# Altium PCB PWM_controller.PcbDoc
Units mm, origin at the board's own origin, x right, y up, seen from the top; angles counter-clockwise.
Board outline 60.25 x 55.25 mm, 2 copper layers (Top Layer, Bottom Layer); 94 components, 42 nets, 210 pads, 36 vias.
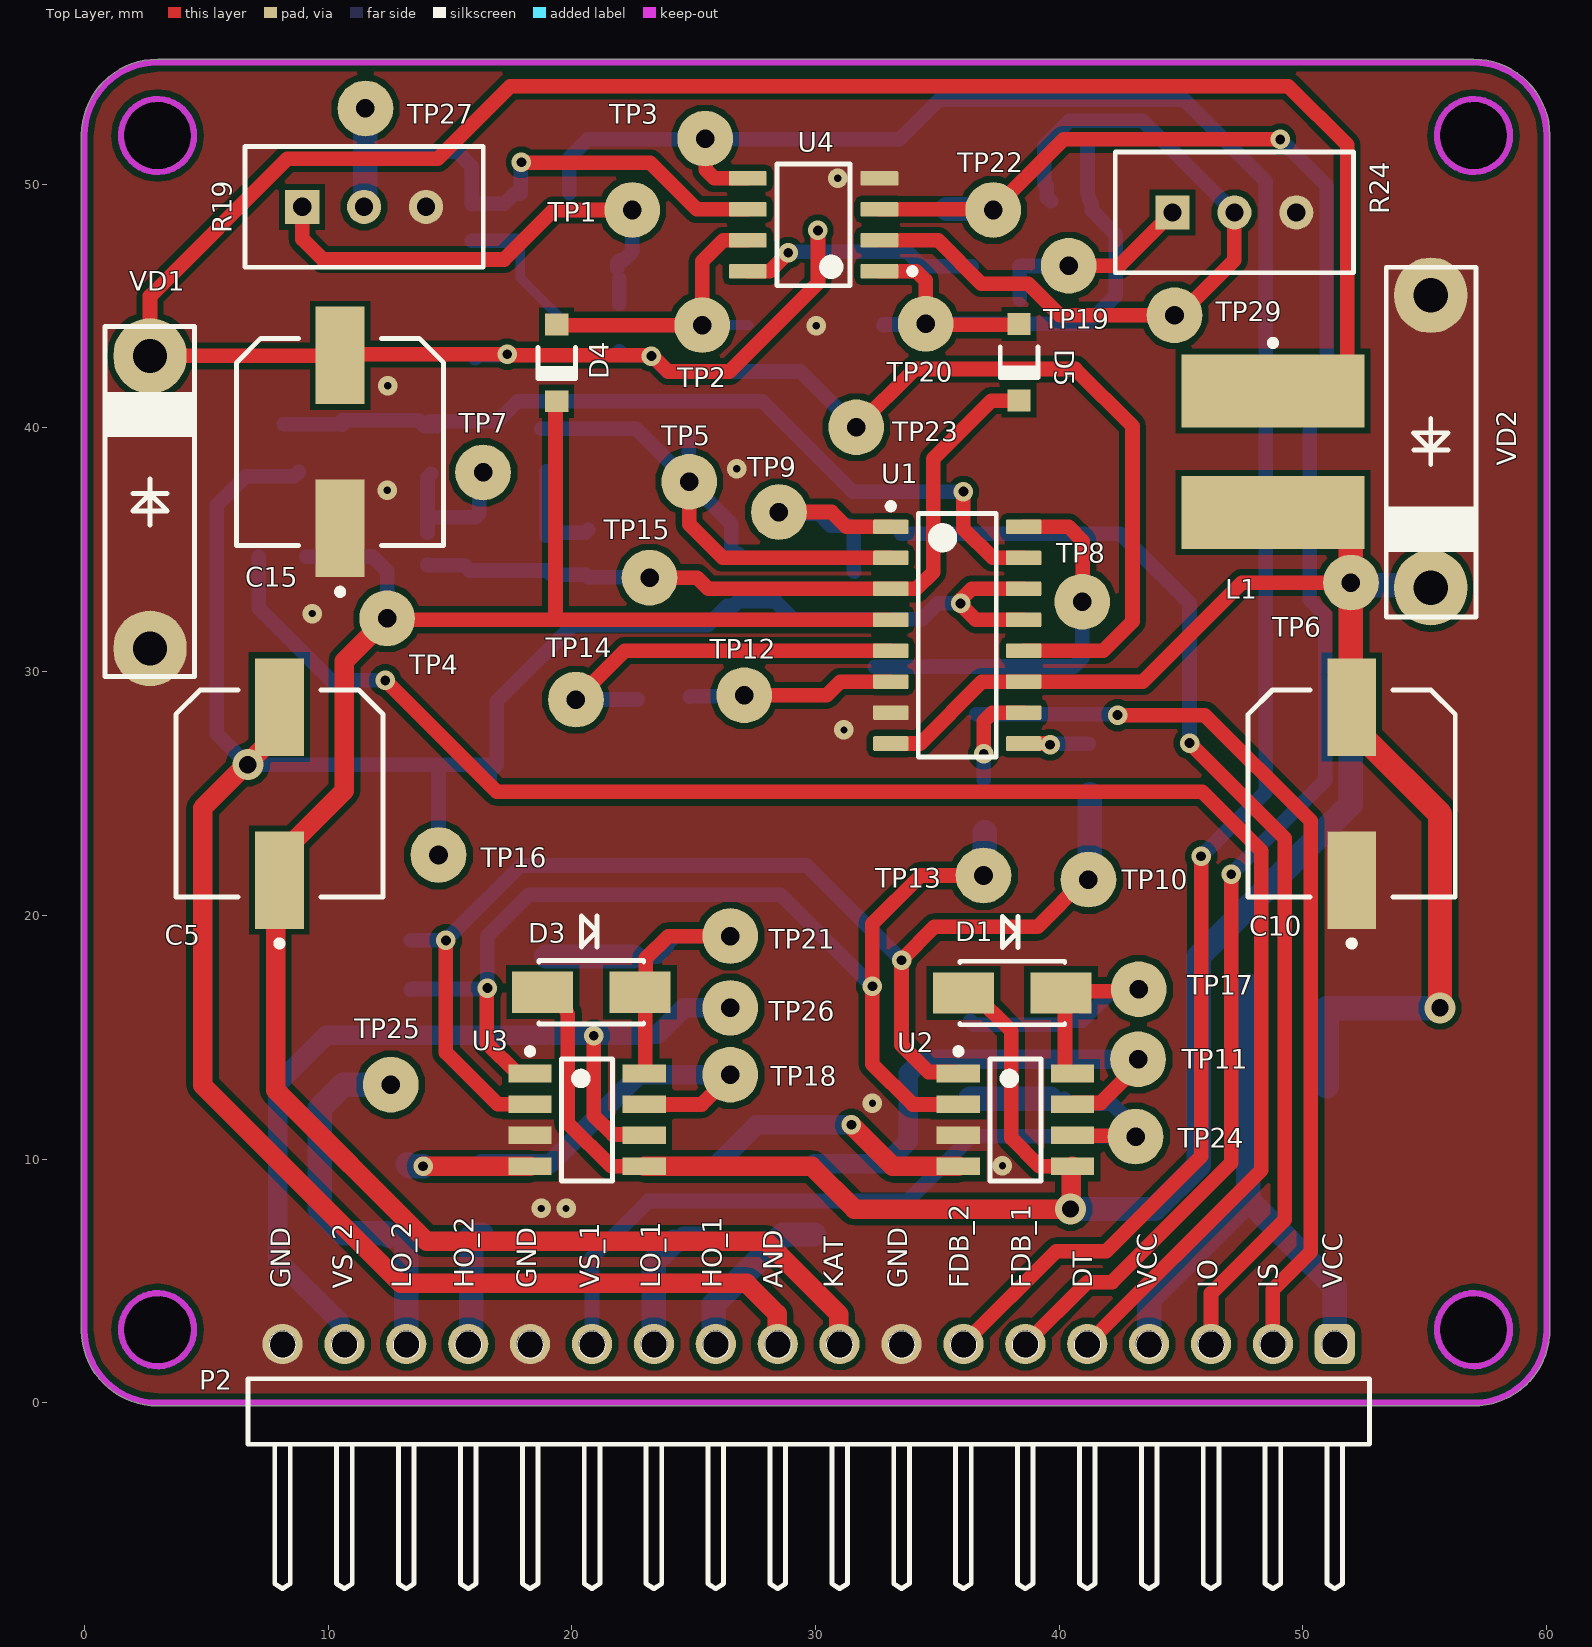
[diagram p0: Top Layer view]
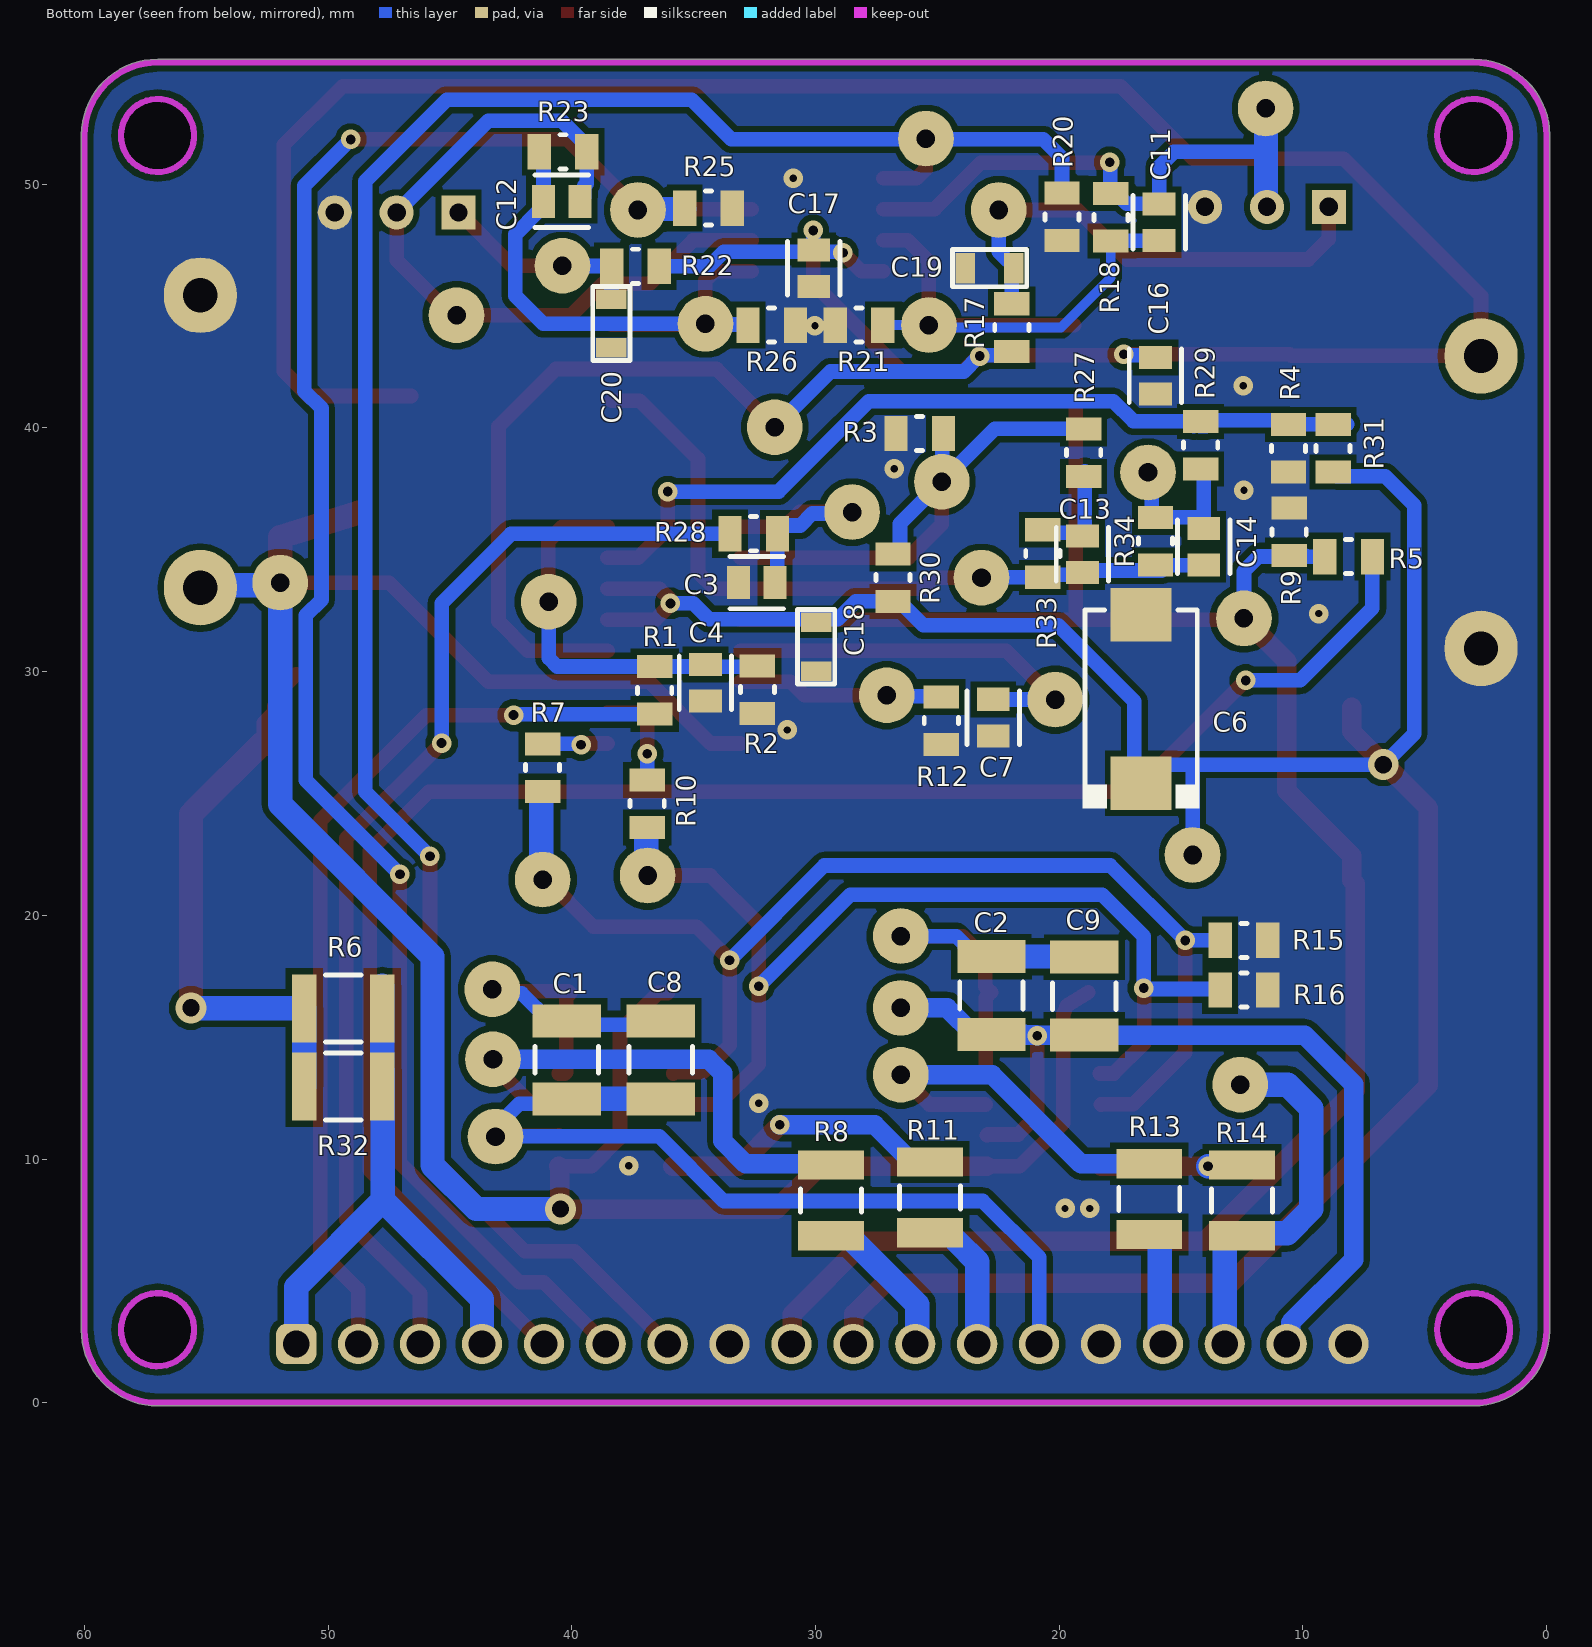
[diagram p1: Bottom Layer view, seen from below]
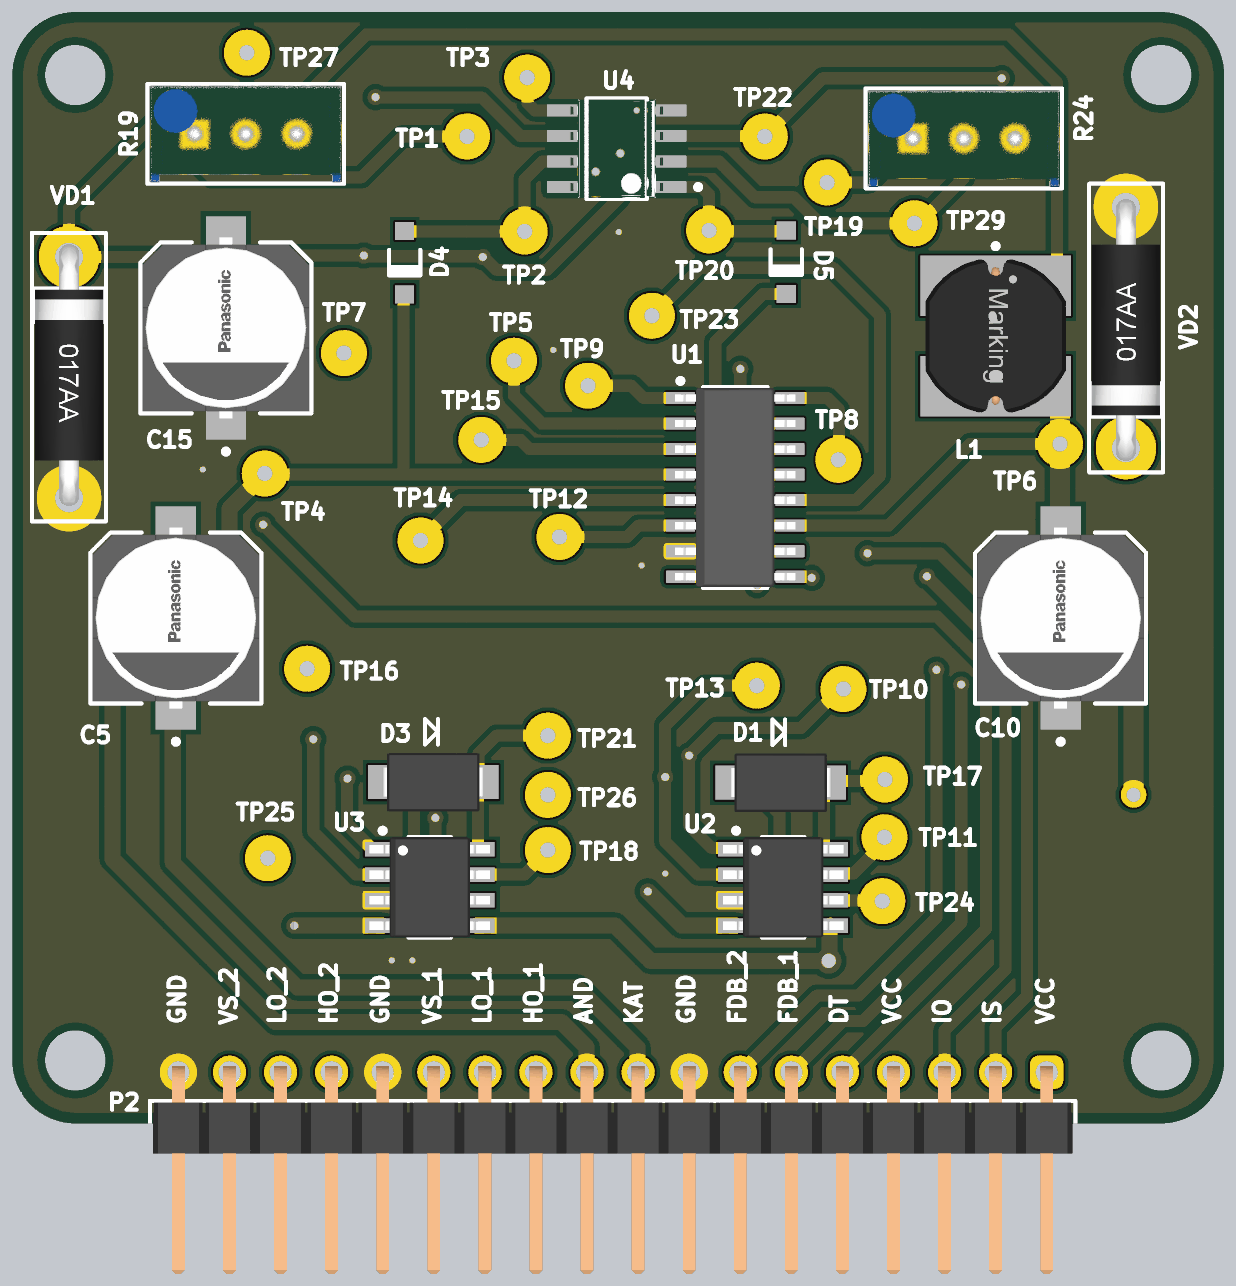
[diagram p2: 3D render of the assembled board from above, using the file's embedded part models]
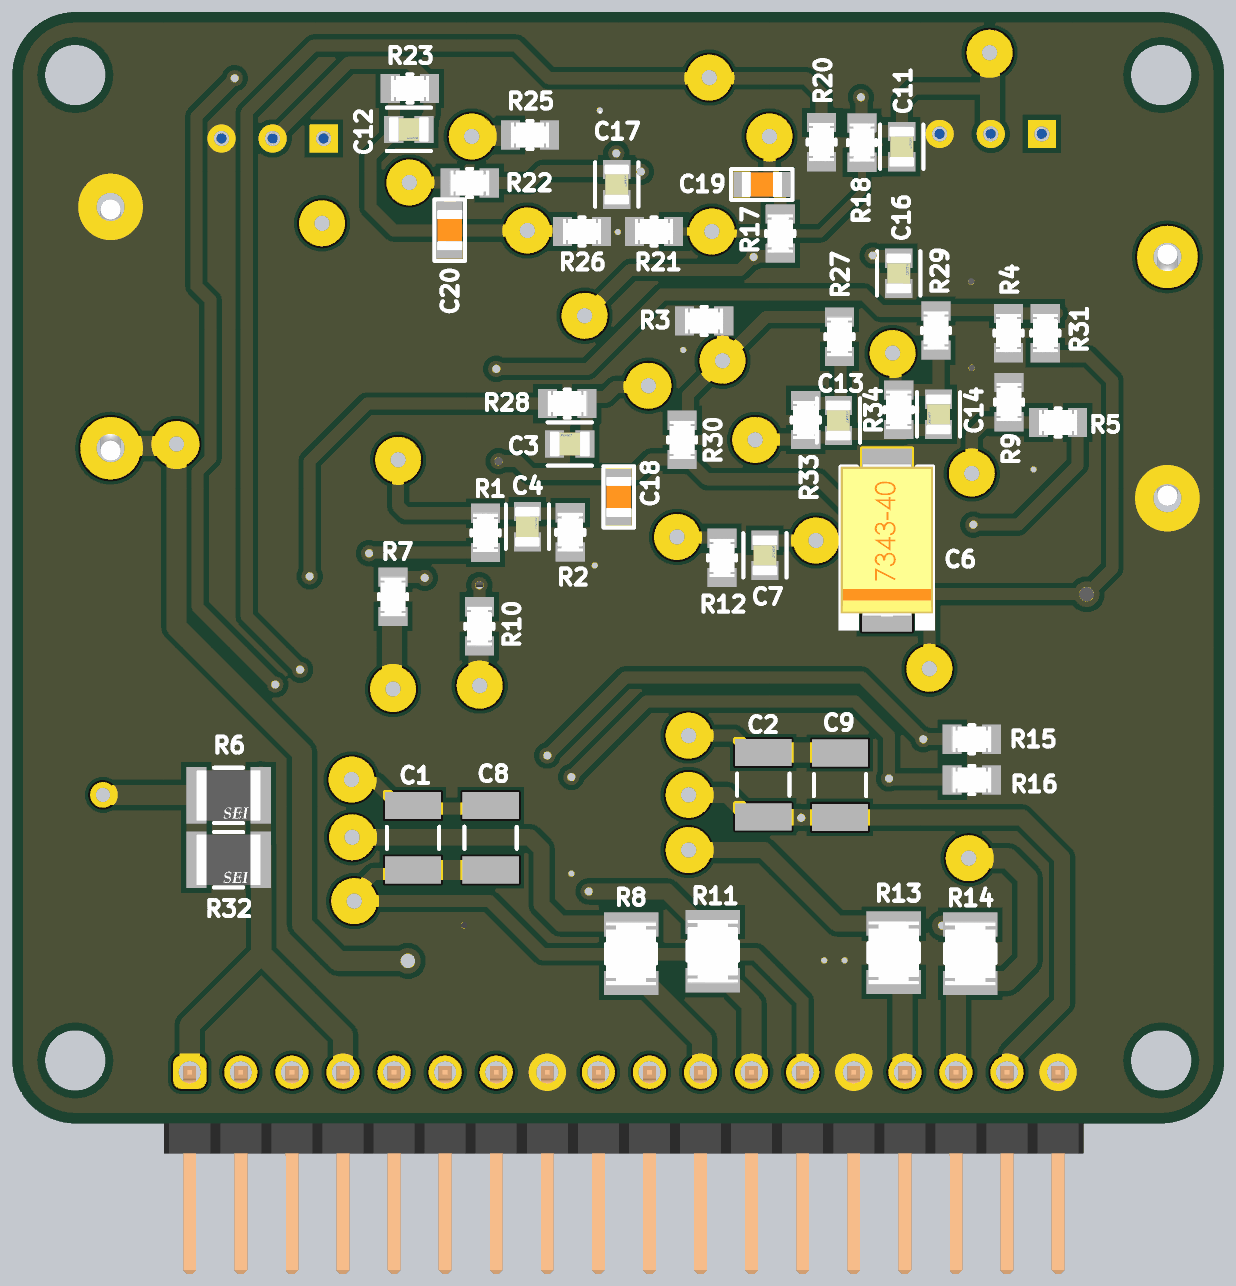
[diagram p3: 3D render of the assembled board from below, using the file's embedded part models]

## Layer stack, top to bottom
Top Solder: solder mask 0.0102, Solder Resist, Dk 3.5
Top Layer: signal copper 0.0356
Dielectric 1: dielectric 0.32, FR-4, Dk 4.8
Bottom Layer: signal copper 0.0356
Bottom Solder: solder mask 0.0102, Solder Resist, Dk 3.5

## Board outline
-0.127,2.972 -0.127,51.999 -0.127,52.024 cw(c3,52) 3,55.127 3.001,55.127 57,55.127 cw(c57,52) 60.127,52.024 60.127,51.999 60.127,3.073 60.127,3 cw(c57,3) 57,-0.127 56.972,-0.127 3.023,-0.127 3,-0.127 cw(c3,3)
cut-out: 1.5,52 ccw(c3,52) 3,50.5 ccw(c3,52) 4.5,52 ccw(c3,52) 3,53.5 ccw(c3,52)
cut-out: 1.5,3 ccw(c3,3) 3,1.5 ccw(c3,3) 4.5,3 ccw(c3,3) 3,4.5 ccw(c3,3)
cut-out: 55.5,3 ccw(c57,3) 57,1.5 ccw(c57,3) 58.5,3 ccw(c57,3) 57,4.5 ccw(c57,3)
cut-out: 55.5,52 ccw(c57,52) 57,50.5 ccw(c57,52) 58.5,52 ccw(c57,52) 57,53.5 ccw(c57,52)

## Design rules (kind name [scope] priority, off if disabled: settings)
Clearance [All] p1: gap=0.254 ignorepadtopadclearanceinfootprint=FALSE except(0: Arc-Hole Track-Hole SMDPad-Hole THPad-Hole Via-Hole Fill-Hole Poly-Hole Region-Hole Text-Hole)
Height [All] p1: minheight=0 maxheight=101.6 prefheight=12.7
PlaneConnect [All] p1: planeconnectstyle=Direct reliefexpansion=0.508 reliefentries=4 reliefconductorwidth=0.254 reliefairgap=0.254
PolygonConnect [All] p1: connectstyle=Direct reliefconductorwidth=0.254 reliefentries=4 polygonreliefangle="90 Angle" airgapwidth=0.254
RoutingVias [All] p1: holewidth=0.711 width=1.27 viastyle="Through Hole" minholewidth=0.2 minwidth=0.5 maxholewidth=0.711 maxwidth=1.27
SolderMaskExpansion [All] p1: expansion=0.102 istentingtop=FALSE
Width [All] p1: maxlimit=3 minlimit=0.254 preferedwidth=1 minimp=50.000000 maximp=50.000000 favimp=50.000000
28 further rules are at their usual default settings.

## Components (designator, comment, footprint, x,y, rotation, side; value= is the part's Value field where it differs from the comment)
C1 "CAP 220nF 50V 1210(3225)" CAPC1210(3225)100_M 40.208,14.072 r270 bottom value=220nF
C2 "CAP 220nF 50V 1210(3225)" CAPC1210(3225)100_M 22.784,16.713 r270 bottom value=220nF
C3 "100nF" FP-C0805C-DN-MFG 32.41,33.655 r180 bottom value="10,000 pF"
C4 "100nF" FP-C0805C-DN-MFG 34.519,29.54 r270 bottom value="10,000 pF"
C5 "EEE-FK1H101GP" FP-FKF-MFG 8,25 r90 top locked
C6 "CAP-POLAR" CAP-TAN-D 16.637,28.88 r90 bottom
C7 "C0805C102K5RACTU" FP-C0805C-DN-MFG 22.708,28.118 r270 bottom value="1,000 pF"
C8 "CAP 220nF 50V 1210(3225)" CAPC1210(3225)100_M 36.347,14.072 r270 bottom value=220nF
C9 "CAP 220nF 50V 1210(3225)" CAPC1210(3225)100_M 18.974,16.688 r270 bottom value=220nF
C10 "EEE-FK1H101GP" FP-FKF-MFG 52,25 r90 top locked
C11 "C0805C102K5RACTU" FP-C0805C-DN-MFG 15.9,48.438 r270 bottom value="1,000 pF"
C12 "C0805C102K5RACTU" FP-C0805C-DN-MFG 40.411,49.301 r0 bottom value="1,000 pF"
C13 "100nF" FP-C0805C-DN-MFG 19.05,34.823 r270 bottom value="10,000 pF"
C14 "100nF" FP-C0805C-DN-MFG 14.072,35.128 r90 bottom value="10,000 pF"
C15 "EEE-FK1H101GP" FP-FKF-MFG 10.49,39.427 r90 top locked
C16 "100nF" FP-C0805C-DN-MFG 16.053,42.139 r270 bottom value="10,000 pF"
C17 "100nF" FP-C0805C-DN-MFG 30.074,46.558 r270 bottom locked value="10,000 pF"
C18 "CAP-NON-POLAR" CAP-0805 29.972,31.023 r90 bottom
C19 "0.1uF" CAP-0805 22.86,46.558 r180 bottom
C20 "0.1uF" CAP-0805 38.379,44.288 r90 bottom
D1 "US1M-13-F" DIOD-SMA-2_A_V 38.075,16.815 r0 top locked
D3 "US1M-13-F" DIOD-SMA-2_A_V 20.803,16.84 r0 top
D4 "1N4148W-7-F" DIOD-SOD123-2_V 19.38,42.672 r270 top
D5 "1N4148W-7-F" DIOD-SOD123-2_V 38.354,42.697 r270 top
L1 "390µH, 0.38A" WE-PD2_7850 48.768,39.025 r270 top
P2 "61301811021" 61301811021 29.718,-0.357 r0 top
R1 "2K" FP-CRCW0805-e3-MFG 36.601,29.235 r90 bottom
R2 "1K" FP-CRCW0805-e3-MFG 32.385,29.261 r270 bottom
R3 "2K" FP-CRCW0805-e3-MFG 25.73,39.776 r0 bottom
R4 "2K" FP-CRCW0805-e3-MFG 10.592,39.167 r270 bottom
R5 "10K" FP-CRCW0805-e3-MFG 8.128,34.722 r0 bottom
R6 "RMCF1210JT51R0" FP-RMCF1210-MFG 49.378,16.18 r180 bottom
R7 "2K" FP-CRCW0805-e3-MFG 41.199,26.06 r90 bottom
R8 "10E" FP-CRCW1210-e3-IPC_B 29.362,8.306 r270 bottom
R9 "5K" FP-CRCW0805-e3-MFG 10.566,35.738 r90 bottom
R10 "2K" FP-CRCW0805-e3-MFG 36.906,24.587 r90 bottom
R11 "10E" FP-CRCW1210-e3-IPC_B 25.298,8.433 r270 bottom
R12 "15K" FP-CRCW0805-e3-MFG 24.841,27.991 r270 bottom
R13 "10E" FP-CRCW1210-e3-IPC_B 16.307,8.357 r270 bottom
R14 "10E" FP-CRCW1210-e3-IPC_B 12.497,8.306 r270 bottom
R15 "1K" FP-CRCW0805-e3-MFG 12.421,18.974 r180 bottom
R16 "1K" FP-CRCW0805-e3-MFG 12.421,16.942 r180 bottom
R17 "10K" FP-CRCW0805-e3-MFG 21.946,44.12 r90 bottom
R18 "1M" FP-CRCW0805-e3-MFG 17.882,48.641 r270 bottom
R19 "10K" RES_Adj_3296W_Bourns 11.476,49.073 r270 top locked
R20 "100K" FP-CRCW0805-e3-MFG 19.888,48.666 r270 bottom
R21 "100K" FP-CRCW0805-e3-MFG 28.219,44.221 r0 bottom
R22 "10K" FP-CRCW0805-e3-MFG 37.389,46.634 r0 bottom
R23 "1M" FP-CRCW0805-e3-MFG 40.361,51.333 r0 bottom
R24 "10K" RES_Adj_3296W_Bourns 47.188,48.844 r270 top locked
R25 "100K" FP-CRCW0805-e3-MFG 34.392,49.022 r180 bottom
R26 "100K" FP-CRCW0805-e3-MFG 31.801,44.221 r180 bottom
R27 "2K" FP-CRCW0805-e3-MFG 18.999,38.989 r270 bottom
R28 "2K" FP-CRCW0805-e3-MFG 32.537,35.662 r180 bottom
R29 "2K" FP-CRCW0805-e3-MFG 14.199,39.294 r270 bottom
R30 "2K" FP-CRCW0805-e3-MFG 26.822,33.858 r270 bottom
R31 "2K" FP-CRCW0805-e3-MFG 8.763,39.167 r270 bottom
R32 "RMCF1210JT51R0" FP-RMCF1210-MFG 49.378,12.979 r180 bottom
R33 "200K" FP-CRCW0805-e3-MFG 20.676,34.849 r270 bottom
R34 "200K" FP-CRCW0805-e3-MFG 16.053,35.357 r90 bottom
TP1 "Test_Point_PCB" Test_Point#1 22.479,48.946 r0 top
TP2 "Test_Point_PCB" Test_Point#1 25.348,44.221 r0 top
TP3 "Test_Point_PCB" Test_Point#1 25.47,51.873 r0 top
TP4 "Test_Point_PCB" Test_Point#1 12.421,32.188 r0 top
TP5 "Test_Point_PCB" Test_Point#1 24.816,37.795 r0 top
TP6 "Test_Point_PCB" Test_Point#1 51.968,33.655 r0 top
TP7 "Test_Point_PCB" Test_Point#1 16.358,38.176 r0 top
TP8 "Test_Point_PCB" Test_Point#1 40.945,32.868 r0 top
TP9 "Test_Point_PCB" Test_Point#1 28.499,36.551 r0 top
TP10 "Test_Point_PCB" Test_Point#2 41.199,21.234 r90 top
TP11 "Test_Point_PCB" Test_Point#3 43.5,14.097 r90 top
TP12 "Test_Point_PCB" Test_Point#1 27.076,29.032 r90 top
TP13 "Test_Point_PCB" Test_Point#4 36.892,21.734 r90 top
TP14 "Test_Point_PCB" Test_Point#1 20.168,28.854 r90 top
TP15 "Test_Point_PCB" Test_Point#1 23.19,33.858 r90 top
TP16 "Test_Point_PCB" Test_Point#1 14.529,22.479 r90 top
TP17 "Test_Point_PCB" Test_Point#5 43.5,16.967 r90 top
TP18 "Test_Point_PCB" Test_Point#6 26.645,13.462 r90 top
TP19 "Test_Point_PCB" Test_Point#1 40.386,46.66 r90 top
TP20 "Test_Point_PCB" Test_Point#1 34.519,44.272 r90 top
TP21 "Test_Point_PCB" Test_Point#7 26.619,19.152 r90 top
TP22 "Test_Point_PCB" Test_Point#1 37.287,48.946 r90 top
TP23 "Test_Point_PCB" Test_Point#1 31.674,40.03 r90 top
TP24 "Test_Point_PCB" Test_Point#8 43.18,10.922 r90 top
TP25 "Test_Point_PCB" Test_Point#9 12.573,13.126 r90 top
TP26 "Test_Point_PCB" Test_Point#10 26.594,16.205 r90 top
TP27 "Test_Point_PCB" Test_Point#1 11.532,53.111 r90 top
TP29 "Test_Point_PCB" Test_Point#1 44.729,44.628 r90 top
U1 "TL494CDR" D0016A_N 35.814,31.496 r0 top
U2 "IR2181STRPBF" INTR-SOIC-8_V 38.202,11.608 r0 top
U3 "IR2181STRPBF" INTR-SOIC-8_V 20.625,11.608 r0 top locked
U4 "LM358DR" FP-D0008A-MFG 29.921,48.336 r180 top locked
VD1 "18V" DO-017AA 2.692,36.957 r270 top
VD2 "18V" DO-017AA 55.245,39.446 r90 top

## Footprints (in the part's own frame and the unit in brackets; to place one, negate y for a bottom-side part, rotate by r counter-clockwise, add the part's x,y. Pads: shape width x height; smd on the part's side, far side on the other; paste and mask are expansions set on the pad)
61301811021 [mm] "Pin Header, pitch 2.54 mm, THT, Angled, single row, 18p"
  rrect50% 1.65x1.65 hole 1.1: 1(21.59,2.77)
  round 1.65 hole 1.1: 2(19.05,2.77) 3(16.51,2.77) 4(13.97,2.77) 5(11.43,2.77) 6(8.89,2.77) 7(6.35,2.77) 8(3.81,2.77) 9(1.27,2.77) 10(-1.27,2.77) 11(-3.81,2.77) 12(-6.35,2.77) 13(-8.89,2.77) 14(-11.43,2.77) 15(-13.97,2.77) 16(-16.51,2.77) 17(-19.05,2.77) 18(-21.59,2.77)
  silkscreen extent -23.01,-7.27 23.01,1.35, body extent -22.86,-7.27 22.86,3.09, height 2.58
CAP-0805 [mm]
  rect 0.8x1.25 smd mask+0.015: 1(-1,0) 2(1,0)
  silkscreen extent -1.52,-0.76 1.52,0.76, body extent -1,-0.62 1,0.63, height 0.8
CAP-TAN-D [mm]
  rect 2.2x2.5 smd: 1(-3.45,0) 2(3.45,0)
  silkscreen extent -4.5,-2.4 3.65,2.4, body extent -3.8,-2.3 3.8,2.3, height 4
CAPC1210(3225)100_M [mm] "Chip Capacitor, Body 3.2x2.5mm, Height 1mm, IPC Low Density"
  rect 1.35x2.8 smd: 1(-1.6,0) 2(1.6,0)
  silkscreen extent -0.55,-1.3 0.55,1.3, body extent -1.7,-1.35 1.7,1.35, height 1
D0016A_N [mm] "SOIC, 16-Leads, Body 10x4mm, Pitch 1.27mm, IPC Medium Density"
  rrect17% 1.45x0.6 smd: 1(-2.725,4.445) 2(-2.725,3.175) 3(-2.725,1.905) 4(-2.725,0.635) 5(-2.725,-0.635) 6(-2.725,-1.905) 7(-2.725,-3.175) 8(-2.725,-4.445) 9(2.725,-4.445) 10(2.725,-3.175) 11(2.725,-1.905) 12(2.725,-0.635) 13(2.725,0.635) 14(2.725,1.905) 15(2.725,3.175) 16(2.725,4.445)
  silkscreen extent -2.85,-5 1.6,5.42, body extent -3,-4.95 3,4.95, height 1.59
DIOD-SMA-2_A_V [mm] "SMA, 2-Leads, Body 4.3x2.605mm"
  rect 2.5x1.7 smd: 1(-2,0) 2(2,0)
  silkscreen extent -2.15,-1.3 2.15,3.14, body extent -2.52,-1.46 2.52,1.46, height 2.4
DIOD-SOD123-2_V [mm] "SOD123, 2-Leads, Body 2.7x1.55mm, Height 1.45mm"
  rect 0.9x0.95 smd: 1(-1.575,0) 2(1.575,0)
  silkscreen extent -0.64,-0.83 0.64,0.77, body extent -1.35,-0.77 1.35,0.77, height 1.45
DO-017AA [mm]
  oval 3.1x3 hole 1.4: 1(-6,0) 2(6,0)
  silkscreen extent -7.2,-1.85 7.15,1.83, body extent -6.63,-1.7 6.37,1.7, height 3.4
FP-C0805C-DN-MFG [mm]
  rect 0.95x1.35 smd paste+0 mask+0: 1(-0.75,0) 2(0.75,0)
  silkscreen extent -1.1,-1.07 1.1,1.07, body extent -1,-0.63 1,0.63, height 0.88
FP-CRCW0805-e3-MFG [mm]
  rect 0.95x1.45 smd paste+0 mask+0: 1(-0.975,0) 2(0.975,0)
  silkscreen extent -0.13,-0.7 0.13,0.7, body extent -1,-0.63 1,0.63, height 0.5
FP-CRCW1210-e3-IPC_B [mm]
  rect 1.205x2.706 smd paste+0 mask+0: 1(-1.451,0) 2(1.451,0)
  silkscreen extent -0.47,-1.25 0.47,1.25, body extent -1.6,-1.25 1.6,1.25, height 0.6
FP-D0008A-MFG [mm]
  rrect17% 1.55x0.6 smd paste+0 mask+0: 1(-2.7,1.905) 2(-2.7,0.635) 3(-2.7,-0.635) 4(-2.7,-1.905) 5(2.7,-1.905) 6(2.7,-0.635) 7(2.7,0.635) 8(2.7,1.905)
  silkscreen extent -4.18,-2.5 1.5,2.5, body extent -3.57,-2.75 3.57,2.75, height 0.25
FP-FKF-MFG [mm]
  rect 4x2 smd paste+0 mask+0: 1(-3.55,0) 2(3.55,0)
  silkscreen extent -6.27,-4.25 4.25,4.25, body extent -5.8,-4.5 5.8,4.5, height 0.25
FP-RMCF1210-MFG [mm]
  rect 1x2.8 smd paste+0 mask+0: 1(-1.6,0) 2(1.6,0)
  silkscreen extent -0.72,-1.38 0.72,1.38, body extent -1.6,-1.25 1.6,1.25, height 0.7
INTR-SOIC-8_V [mm]
  rect 1.78x0.72 smd: 1(-2.34,1.905) 2(-2.34,0.635) 3(-2.34,-0.635) 4(-2.34,-1.905) 5(2.34,-1.905) 6(2.34,-0.635) 7(2.34,0.635) 8(2.34,1.905)
  silkscreen extent -2.46,-2.5 1.05,2.94, body extent -3,-2.5 3,2.5, height 1.75
RES_Adj_3296W_Bourns [mm]
  rect 1.4x1.4 hole 0.75 paste-2539.97 mask+0: 1(0,-2.54)
  round 1.4 hole 0.75 paste-2539.97 mask+0: 2(0,0) 3(0,2.54)
  silkscreen extent -2.49,-4.89 2.47,4.89, body extent -2.59,-4.99 2.57,4.99, height 0.25
Test_Point#1 [mil]
  round 90 hole 30 paste-99999 mask+4: 1(0,0)
Test_Point#2 [mil]
  round 90 hole 30 paste-99999 mask+4: 1(9.2,0)
Test_Point#3 [mil]
  round 90 hole 30 paste-99999 mask+4: 1(0,10.4)
Test_Point#4 [mil]
  round 90 hole 30 paste-99999 mask+4: 1(-3.8,0.08)
Test_Point#5 [mil]
  round 90 hole 30 paste-99999 mask+4: 1(0,9.4)
Test_Point#6 [mil]
  round 90 hole 30 paste-99999 mask+4: 1(0,5.69)
Test_Point#7 [mil]
  round 90 hole 30 paste-99999 mask+4: 1(0,4.69)
Test_Point#8 [mil]
  round 90 hole 30 paste-99999 mask+4: 1(0,1.93)
Test_Point#9 [mil]
  round 90 hole 30 paste-99999 mask+4: 1(-2.76,0)
Test_Point#10 [mil]
  round 90 hole 30 paste-99999 mask+4: 1(0,3.69)
WE-PD2_7850 [mm] "SMD Power Inductor, 2-Leads, body 7.8x7mm"
  rect 3x7.5 smd: 1(-2.5,0) 2(2.5,0)
  silkscreen extent -4.59,-0.12 -4.34,0.13, body extent -3.81,-3.5 3.81,3.5, height 4.95

## Part data
C1 C2 C8 C9: library part CMP-1038-01811-1, "CAP 220nF 50V ±10% 1210 (3225 Metric) Thickness 1mm SMD", Case-EIA=1210, Case-Metric=3225, Rated Voltage="50 V", Tolerance=Â±10%, Max Thickness="1 mm", Technology=SMT
C3 C4 C13 C14 C16 C17: library part CMP-2007-00254-2, "CAP CER 10000PF 50V X7R 0805", Capacitance="10,000 pF", Manufacturer=KEMET, Manufacturer Part Number=C0805C103J5RACTU, Package=C0805C-DN, Temperature="-55°C to +125°C", Temperature Characteristic=X7R, Temperature Coefficient=30ppm/°C, Temperature Range High=+125°C, Temperature Range Low=-55°C, Tolerance=0.05, Voltage Rating="50 V", Automotive=No, Category=Cap, ComponentLink2Description=Datasheet, ComponentLink2URL=https://content.kemet.com/datasheets/KEM_C1003_C0G_SMD.pdf, Device Class L1="Passive Components", Device Class L2=Capacitors, Device Class L3="Ceramic Capacitors", Digikey Description="CAP CER 10000PF 50V X7R 0805", Height=0.88mm, Ipc Land Pattern Name=CAPC200125X78, Lead Free=Yes, Material=Ceramic, Mouser Description="Capacitor; Ceramic; Cap 0.01uF; Tol 5%; Vol-Rtg 50 V; SMT; Case 0805; X7R; TR", Octopart=https://octopart.com/c0805c103j5ractu-kemet-133473, RoHS=TRUE
C5 C10 C15: library part CMP-05427-000032-1, "CAP ALUM 100UF 20% 50V SMD", Capacitance=100uF, Case/Package=SMD/SMT, ESR (Equivalent Series Resistance)=340mR, Leakage Current=10mA, Max Operating Temperature=105°C, Min Operating Temperature=-55°C, Package Quantity=1, Ripple Current=350mA, Tolerance=20%, Voltage=50V, Construction=Cylindrical, Contact Plating=Tin, Diameter=8mm, Height=10.2mm, Height - Seated (Max)=0.402inch, Impedance=340mR, Lead Free="Lead Free", Length=10.2mm, Life (Hours)=5000Hour, Mount="Surface Mount", Number of Pins=2, Packaging="Tape and Reel", Radiation Hardening=No, REACH SVHC="No SVHC", Ripple Current (AC)=350mA, RoHS Compliant=Yes, Series=FK, Termination=SMD/SMT, Voltage Rating=50V, Voltage Rating (DC)=50V, Width=10mm
C7 C11 C12: library part CMP-2007-01097-2, "CAP CER 1000PF 50V X7R 0805", Capacitance="1,000 pF", Manufacturer=KEMET, Package=C0805C-DN, Temperature="-55°C to +125°C", Temperature Characteristic=X7R, Temperature Coefficient=30ppm/°C, Temperature Range High=+125°C, Temperature Range Low=-55°C, Tolerance=0.1, Voltage Rating="50 V", Automotive=No, Category=Cap, ComponentLink2Description=Datasheet, ComponentLink2URL=https://content.kemet.com/datasheets/KEM_C1003_C0G_SMD.pdf, Device Class L1="Passive Components", Device Class L2=Capacitors, Device Class L3="Ceramic Capacitors", Digikey Description="CAP CER 1000PF 50V X7R 0805", Height=0.88mm, Ipc Land Pattern Name=CAPC200125X78, Lead Free=Yes, Manufacturer Part Number=C0805C102K5RACTU, Material=Ceramic, Mouser Description="Cap Ceramic 0.001uF 50V X7R 10% SMD 0805 125C Plastic T/R", Octopart=https://octopart.com/c0805c102k5ractu-kemet-93010, RoHS=TRUE
C19 C20: library part CAP-NON-POLAR
D1 D3: library part CMP-2000-07364-1, "Ultra-Fast Rectifier, 1 A, 1.7 V, -65 to 150 degC, 2-Pin SMA, RoHS, Tape and Reel", Average Rectified Current-Max=1A, Forward Voltage=1.7V, Manufacturer="Diodes Inc", Package Description="2-Pin Surface Mount Device, Body 4.3 x 2.605 mm", Package Reference=SMA-2, Reverse Current-Max=5µA, Reverse Voltage-Max [Vrrm]=1000V, Datasheet URL=http://www.diodes.com/_files/datasheets/ds16008.pdf, Datasheet Version="Rev. 11-2, 12/2014", Manufacturer URL=http://www.diodes.com/, Mounting Technology=SurfaceMount, Reverse Recovery Time-Max=75ns
D4 D5: library part CMP-2000-04932-2, "Fast Switching Diode, 100 V, 0.15 A, -65 to 150 degC, 2-Pin?SOD123, RoHS, Tape and Reel", If - Forward Current=0.15A, Ir - Reverse Current=1uA, Manufacturer=DiodesIncorporated, Max Surge Current=2A, Maximum Operating Temperature=+150C, Minimum Operating Temperature=-65C, Operating Temperature Range=-65Cto+150C, Package / Case=SOD-123, Package Reference=SOD123-2, Peak Reverse Voltage=100V, Vf - Forward Voltage=1.25V, Brand=DiodesIncorporated, Configuration=Single, Datasheet URL=http://www.farnell.com/datasheets/1915529.pdf, Datasheet Version="Rev. 24-2, 10/2013", Factory Pack Quantity=3000, Height=1.25mm, Length=2.85mm, Manufacturer URL=http://www.diodes.com/, Mounting Style=SMD/SMT, Package URL=http://www.diodes.com/datasheets/ds18004.pdf, Packaging=Reel, Product=SwitchingDiodes, Product Category=Diodes-GeneralPurpose,Power,Switching, Recovery Time=4ns, RoHS=True, Series=1N4148, Type=SwitchingDiode, Unit Weight=0.000353oz, Width=1.7mm
L1: library part 744775239, "WE-PD2 SMT Power Inductor, size 7850, 390µH, 0.38A, 1.77Ω", Case/Size Code=7850, DC Resistance=1.151Ω, DC Resistance Max=1.77Ω, Inductance=390µH, Manufacturer="Wurth Elektronik", Operating Temperature Max=125°C, Operating Temperature Min=-40°C, Rated Current=0.38A, Saturation Current=0.43A, Self Resonant Frequency=3.9MHz, Category="Unshielded Power Inductors", ComponentLink1Description="Website Link", ComponentLink1URL=https://www.we-online.com/redexpert/article/744775239?ad, ComponentLink2Description="Datasheet Link", ComponentLink2URL=https://www.we-online.com/redexpert/spec/744775239?ad, Height=4.95mm, Length=7.8mm, Manufacturer Part Number=744775239, Match Code=WE-PD2, Mount="Surface Mount", Packaging="Tape and Reel", Width=7mm
P2: "WR-PHD Pin Header, THT, Angled, pitch 2.54mm, 1 Row, 18P", Contact Resistance=20mΩ, Manufacturer="Wurth Elektronik", Operating Temperature Max=105°C, Operating Temperature Min=-40°C, Rated Current=3A, Withstanding Voltage=500V, Working Voltage=250V, Category="Board-to-Board Connectors", ComponentLink1Description="Website Link", ComponentLink1URL=https://www.we-online.com/redexpert/article/61301811021?ad, ComponentLink2Description="Datasheet Link", ComponentLink2URL=https://www.we-online.com/redexpert/spec/61301811021?ad, Gender="Pin Header", Manufacturer Part Number=61301811021, Match Code=WR-PHD, Mount="Through Hole", Number of Pins=18, Number of Rows=1, Orientation=Angled, Packaging=Bag, Pitch=2.54mm
R1 R2 R4 R7 R10 R15 R16 R27 R28 R29 R30 R31 R33 R34: library part CMP-2001-04908-2, "RES Thick Film, 2kΩ, 1%, 0.125W, 100ppm/°C, 0805", Case Code (Imperial)=0805, Case Code (Metric)=2012, Max Operating Temperature=155°C, Min Operating Temperature=-55°C, Package Quantity=5000, Power Rating=125mW, Resistance=10kR, Temperature Coefficient=100ppm/°C, Tolerance=1%, Voltage Rating=150V, Case/Package=0805, Composition="Thick Film", Contact Plating=Tin, Depth=1.25mm, Height=0.45mm, Lead Free="Lead Free", Length=2mm, Military Standard=Not, Packaging="Tape and Reel", Radiation Hardening=No, Termination=SMD/SMT, Voltage Rating (DC)=150V, Weight=0.000194oz, Width=1.25mm
R3 R9: library part CMP-2001-04908-2, "RES Thick Film, 82kΩ, 1%, 0.125W, 100ppm/°C, 0805", Case Code (Imperial)=0805, Case Code (Metric)=2012, Max Operating Temperature=155°C, Min Operating Temperature=-55°C, Package Quantity=5000, Power Rating=125mW, Resistance=10kR, Temperature Coefficient=100ppm/°C, Tolerance=1%, Voltage Rating=150V, Case/Package=0805, Composition="Thick Film", Contact Plating=Tin, Depth=1.25mm, Height=0.45mm, Lead Free="Lead Free", Length=2mm, Military Standard=Not, Packaging="Tape and Reel", Radiation Hardening=No, Termination=SMD/SMT, Voltage Rating (DC)=150V, Weight=0.000194oz, Width=1.25mm
R5 R17 R22: library part CMP-2001-04908-2, "RES Thick Film, 10kΩ, 1%, 0.125W, 100ppm/°C, 0805", Case Code (Imperial)=0805, Case Code (Metric)=2012, Max Operating Temperature=155°C, Min Operating Temperature=-55°C, Package Quantity=5000, Power Rating=125mW, Resistance=10kR, Temperature Coefficient=100ppm/°C, Tolerance=1%, Voltage Rating=150V, Case/Package=0805, Composition="Thick Film", Contact Plating=Tin, Depth=1.25mm, Height=0.45mm, Lead Free="Lead Free", Length=2mm, Military Standard=Not, Packaging="Tape and Reel", Radiation Hardening=No, Termination=SMD/SMT, Voltage Rating (DC)=150V, Weight=0.000194oz, Width=1.25mm
R6 R32: library part CMP-26527-006785-1, "51Ω ±5% 0.5W 1210 Thick Film Chip Resistor AEC-Q200 compliant", Case Code (Imperial)=1210, Case Code (Metric)=3225, Max Operating Temperature=155°C, Max Power Dissipation=500mW, Min Operating Temperature=-55°C, Resistance=51R, Resistor Type="Thick Film", Temperature Coefficient=200ppm/°C, Tolerance=5%, Case/Package=1210, Contact Plating=Tin, Features="Automotive AEC-Q200", Height=0.028inch, Lead Free="Lead Free", Length=0.126inch, Mount="Surface Mount", Number of Terminations=2, Packaging="Tape and Reel", Radiation Hardening=No, RoHS Compliant=Yes, Series=RMCF, Width=0.098inch
R8 R11 R13 R14: library part CMP-2005-01987-2, "RES SMD 10 OHM 1% 1/2W 1992", Case Code (Imperial)=1210, Case Code (Metric)=3225, Max Operating Temperature=155°C, Max Power Dissipation=500mW, Min Operating Temperature=-55°C, Package Quantity=1, Resistance=0mR, Temperature Coefficient=0ppm/°C, Voltage Rating=200V, Case/Package=1210, Composition="Thick Film", Contact Plating=Tin, Depth=2.5mm, Features="Automotive AEC-Q200", Height=0.55mm, Length=3.2mm, Military Standard=Not, Mount="Surface Mount", Number of Terminations=2, Packaging="Tape and Reel", Power Rating=500mW, Radiation Hardening=No, REACH SVHC="No SVHC", Termination=SMD/SMT, Weight=0.000564oz, Width=0.098inch
R12: library part CMP-2001-04908-2, "RES Thick Film, 15kΩ, 1%, 0.125W, 100ppm/°C, 0805", Case Code (Imperial)=0805, Case Code (Metric)=2012, Max Operating Temperature=155°C, Min Operating Temperature=-55°C, Package Quantity=5000, Power Rating=125mW, Resistance=10kR, Temperature Coefficient=100ppm/°C, Tolerance=1%, Voltage Rating=150V, Case/Package=0805, Composition="Thick Film", Contact Plating=Tin, Depth=1.25mm, Height=0.45mm, Lead Free="Lead Free", Length=2mm, Military Standard=Not, Packaging="Tape and Reel", Radiation Hardening=No, Termination=SMD/SMT, Voltage Rating (DC)=150V, Weight=0.000194oz, Width=1.25mm
R18 R23: library part CMP-2001-04908-2, "RES Thick Film, 1MΩ, 1%, 0.125W, 100ppm/°C, 0805", Case Code (Imperial)=0805, Case Code (Metric)=2012, Max Operating Temperature=155°C, Min Operating Temperature=-55°C, Package Quantity=5000, Power Rating=125mW, Resistance=10kR, Temperature Coefficient=100ppm/°C, Tolerance=1%, Voltage Rating=150V, Case/Package=0805, Composition="Thick Film", Contact Plating=Tin, Depth=1.25mm, Height=0.45mm, Lead Free="Lead Free", Length=2mm, Military Standard=Not, Packaging="Tape and Reel", Radiation Hardening=No, Termination=SMD/SMT, Voltage Rating (DC)=150V, Weight=0.000194oz, Width=1.25mm
R19 R24: library part RES_Adj
R20 R21 R25 R26: library part CMP-2001-04908-2, "RES Thick Film, 100kΩ, 1%, 0.125W, 100ppm/°C, 0805", Case Code (Imperial)=0805, Case Code (Metric)=2012, Max Operating Temperature=155°C, Min Operating Temperature=-55°C, Package Quantity=5000, Power Rating=125mW, Resistance=10kR, Temperature Coefficient=100ppm/°C, Tolerance=1%, Voltage Rating=150V, Case/Package=0805, Composition="Thick Film", Contact Plating=Tin, Depth=1.25mm, Height=0.45mm, Lead Free="Lead Free", Length=2mm, Military Standard=Not, Packaging="Tape and Reel", Radiation Hardening=No, Termination=SMD/SMT, Voltage Rating (DC)=150V, Weight=0.000194oz, Width=1.25mm
TP1 TP2 TP3 TP4 TP5 TP6 TP7 TP8 TP9 TP10 TP11 TP12 TP13 TP14 TP15 TP16 TP17 TP18 TP19 TP20 TP21 TP22 TP23 TP24 TP25 TP26 TP27 TP29: library part TP_PCB?, "Test_Point"
U1: library part CMP-0319-00950-2, "Pulse-Width-Modulation Control Circuit with Voltage Control, 45 % Duty Cycle, 0 to +70 degC, 16-pin SOIC (D), Green (RoHS & no Sb/Br)", Frequency(Max)(kHz)=300, Manufacturer="Texas Instruments", Rating=Military, Code_JEDEC=MS-012AC, ComponentLink1Description=Datasheet, ComponentLink1URL=http://www.ti.com/general/docs/lit/getliterature.tsp?genericPartNumber=TL494&fileType=pdf, Control Method=Voltage, DatasheetVersion=SLVS074E, Duty Cycle(Max)(%)=45, Eco-Plan="Green (RoHS & no Sb/Br)", Mounting Technology="Surface Mount", PackageDescription="16-Pin Plastic Small Outline Integrated Circuit, 9.9 x 3.9 mm, Pitch 1.27 mm Pitch", PackageReference=D0016A, PackageVersion="revM, Jun-2011", PartNumber=TL494CDR, Regulated Outputs(#)=2, SubFamily="PWM Controller", Topology="Boost, Buck, Flyback, Forward, Full-Bridge, Half-Bridge, Push-Pull"
U2 U3: library part CMP-1671-00001-2, "IC DRIVER HIGH/LOW SIDE 8SOIC", Manufacturer="International Rectifier", ComponentLink1Description=Datasheet, ComponentLink1URL=http://www.infineon.com/dgdl/ir2181.pdf?fileId=5546d462533600a4015355c93cdd16ce, PackageReference=SOIC-8, PartNumber=IR2181STRPBF
U4: library part CMP-1685-00009-2, "IC OPAMP GP 2 CIRCUIT 8SOIC", Case/Package=SOIC, Dual Supply Voltage=9V, Input Bias Current=250nA, Input Offset Voltage (Vos)=7mV, Max Dual Supply Voltage=16V, Max Operating Temperature=70°C, Max Supply Voltage=32V, Min Dual Supply Voltage=1.5V, Min Operating Temperature=0°C, Min Supply Voltage=3V, Nominal Supply Current=1.2mA, Operating Supply Current=1mA, Output Current=30mA, Package Quantity=2500, Power Supply Rejection Ratio (PSRR)=65dB, Voltage Gain=100dB, Bandwidth=700kHz, Common Mode Rejection Ratio=65dB, Contact Plating=Gold, Gain Bandwidth Product=700kHz, Height=1.58mm, Lead Free="Lead Free", Length=4.9mm, Mount="Surface Mount", Number of Amplifiers=2, Number of Channels=2, Number of Circuits=2, Number of Elements=2, Number of Pins=8, Operating Supply Voltage=16V, Output Current per Channel=30mA, Packaging="Tape and Reel", Radiation Hardening=No, REACH SVHC="No SVHC", Slew Rate=0.3V/µs, Unity Gain Bandwidth Product=700kHz, Width=3.91mm
VD1 VD2: library part ZENER

## Via types
v1: diameter 0.8, hole 0.4, Top Layer to Bottom Layer, tented both sides, 22 vias
v2: diameter 0.8, hole 0.3, Top Layer to Bottom Layer, tented both sides, 11 vias
v3: diameter 1.27, hole 0.711, Top Layer to Bottom Layer, tented both sides, 2 vias
v4: diameter 1.27, hole 0.711, Top Layer to Bottom Layer, 1 vias

## Nets (pads, with @x,y where several pads share a name; then routed paths per layer and width w, separated by ;. In a path a pad name is that pad's centre, name@x,y a point inside that pad or via, vN(x,y) a via of type N, cw(c..) or ccw(c..) an arc to the next point about the centre after c; other vN are vias at no path point)
GND: C3.1 C4.2 C6.2 C7.2 C10.1 C15.1 C16.2 C17.2 C18.1 C19.1 C20.1 P2.8 P2.14 P2.18 R2.2 R3.2 R4.2 R9.2 R12.2 R15.2 R16.2 R19.3 R20.2 R21.2 R24.3 R25.2 R26.2 U1.7 U2.3 U3.3 U4.4 VD1.2 VD2.2
  other v2: 18.745,7.976 19.761,7.976 37.668,9.728 32.334,12.294 31.166,27.61 9.347,32.385 12.421,37.44 26.772,38.329 12.446,41.732 30.023,44.196 30.912,50.241
NetC1_1: C1.1 C8.1 D1.2 TP17.1 U2.8 | length 14.9
  Top Layer w0.6: U2.8 40.294,13.513 40.234,13.573 40.234,16.656 D1.2 40.151,16.891 43.424,16.891 TP17.1@43.5,16.967
  Bottom Layer w0.6: C8.1 36.5,15.519 40.056,15.519 C1.1 40.933,15.672 42.065,16.804 43.336,16.804 TP17.1@43.5,16.967
NetC1_2: C1.2 C8.2 P2.13 TP24.1 U2.6 | length 38.5
  Top Layer w0.6: U2.6 40.561,10.954 43.481,10.954 TP24.1@43.5,10.935
  Bottom Layer w0.6: P2.13 20.828,5.969 23.139,8.28 33.757,8.28 36.411,10.935 43.5,10.935 42.157,12.278 40.402,12.278 C1.2
  Bottom Layer w1: C8.2 C1.2@39.624,12.472
NetC2_1: C2.1 C9.1 D3.2 TP21.1 U3.8 | length 16.5
  Top Layer w0.6: U3.8@23.016,13.513 23.016,16.627 22.911,16.732 D3.2 23.039,17.077 23.039,18.239 23.952,19.152 TP21.1
  Bottom Layer w0.6: C2.1 23.509,18.313 23.884,18.688 23.884,18.8 24.235,19.152 TP21.1 ; TP21.1@26.949,18.974 TP21.1@26.988,18.936
  Bottom Layer w1: C9.1@18.954,18.313 C2.1@22.519,18.313
NetC2_2: C2.2 C9.2 P2.17 TP26.1 U3.6 | length 37.6
  Top Layer w0.6: v1(20.904,15.062) 20.904,11.786 21.68,11.01 22.927,11.01 U3.6
  Bottom Layer w0.8: P2.17 10.505,2.576 10.505,3.287 7.925,5.867 7.925,13.081 9.932,15.088 C9.2 ; C9.2@19.279,15.088 20.904,15.088 21.412,15.088 22.759,15.088 C2.2 23.509,15.113 24.601,16.205 TP26.1@26.506,16.205 ; v1(20.904,15.062) 20.942,15.1 21.4,15.1 C2.2@21.412,15.113
NetC3_2: C3.2 R28.2 TP9.1 U1.1 | length 9.9
  Top Layer w0.6: TP9.1 30.658,36.551 31.267,35.941 U1.1
  Bottom Layer w0.6: TP9.1 28.556,36.493 30.131,36.493 30.626,35.998 31.387,35.998 31.562,35.823 R28.2 31.574,35.65 31.574,34.124 C3.2@31.586,34.112
NetC4_1: C4.1 R1.2 R2.1 TP8.1 U1.16 | length 15.9
  Top Layer w0.6: U1.16 40.386,35.941 40.97,35.357 TP8.1@40.97,33.096
  Bottom Layer w0.6: R2.1@32.423,30.198 34.693,30.198 34.706,30.21 R1.2 40.593,30.21 40.945,30.562 TP8.1
NetC5_1: C5.1 D4.2 P2.9 R5.2 R9.1 TP4.1 U1.4 | length 84.4
  Top Layer w0.6: TP4.1@12.598,32.131 19.228,32.131 ; D4.2 19.329,41.046 19.329,32.233 19.228,32.131 ; U1.4 19.228,32.131
  Top Layer w0.8: TP4.1 10.668,30.436 10.668,25.118 8,22.45 C5.1 7.849,21.299 7.849,12.827 14.046,6.629 27.965,6.629 30.953,3.642 30.953,2.448 P2.9
  Bottom Layer w0.6: R5.2 R9.1@9.887,34.722 ; R9.1@9.887,34.755 R9.1@10.482,34.755 ; R9.1 10.601,34.728 11.805,34.728 12.421,34.112 TP4.1
NetC5_2: C5.2 C6.1 C18.2 P2.10 R30.2 R31.2 TP16.1 U1.13 U1.14 | length 107.1
  Top Layer w0.6: v1(35.952,32.801) 35.952,32.747 36.568,32.131 U1.13 ; v1@35.977,32.801 35.99,32.815 35.99,32.988 36.404,33.401 U1.14
  Top Layer w0.8: v3(6.706,26.187) 6.706,26.256 C5.2@8,27.55 ; C5.2 C5.2@8,27.55 ; P2.10 28.426,2.435 28.426,3.654 27.178,4.902 12.979,4.902 4.851,13.03 4.851,24.401 C5.2@8,27.55
  Bottom Layer w0.6: R31.2@8.788,38.192 8.613,38.017 6.629,38.017 5.436,36.823 5.436,27.457 v3(6.706,26.187) 14.402,26.187 ; TP16.1 14.529,26.06 14.402,26.187 ; C6.1 16.637,25.908 C6.1@16.916,26.187 ; v1(35.952,32.801) 35.011,32.801 34.366,32.156 29.972,32.156 29.083,32.156 28.356,32.883 R30.2 26.647,32.708 26.384,32.708 25.578,31.902 20.041,31.902 16.916,28.778 C6.1@16.916,26.187 ; 14.402,26.187 16.637,26.187 C6.1@16.916,26.187
NetC7_1: C7.1 TP14.1 U1.5 | length 16.3
  Top Layer w0.6: TP14.1 22.174,30.861 U1.5
  Bottom Layer w0.6: TP14.1@20.162,28.848 TP14.1 20.174,28.861 22.701,28.861 C7.1
NetC10_2: C10.2 D1.1 D3.1 L1.2 R6.1 R32.1 TP6.1 U1.8 U1.11 U2.5 U3.5 VD2.1 | length 131.2
  Top Layer w0.6: D3.1 19.695,16.29 19.837,15.939 ; 19.837,15.939 19.837,14.79 19.837,11.481 21.615,9.703 U3.5 ; U1.8 34.29,27.051 36.83,29.591 U1.11 43.434,29.591 47.498,33.655 TP6.1@51.587,33.655 ; D1.1 36.475,16.815 38.024,15.266 38.024,10.867 39.188,9.703 U2.5 ; C10.2@51.3,29.889 52,29.189 C10.2 52.646,27.904 C10.2@52.646,27.2
  Top Layer w0.8: U3.5 29.845,9.703 31.598,7.95 v3(40.462,7.95) 40.502,7.99 40.502,9.663 U2.5
  Top Layer w1: L1.2 51.968,35.525 C10.2@51.968,29.616 ; C10.2 52,27.55 52.5,27.05 52.731,27.05 55.474,24.308 55.626,24.155 v4(55.626,16.205)
  Bottom Layer w0.6: TP6.1 TP6.1@52.073,33.551 ; VD2.1@55.141,33.551 VD2.1
  Bottom Layer w1: v3(40.462,7.95) 43.917,7.95 45.72,9.754 45.72,18.313 51.968,24.562 TP6.1 ; R32.1 R6.1 50.978,16.192 55.613,16.192 v4(55.626,16.205) ; TP6.1@52.073,33.551 VD2.1@55.141,33.551
NetC11_1: C11.1 R18.1 R19.2 TP27.1 U4.6 | length 23.9
  Top Layer w0.6: v1(17.932,50.902) 17.958,50.876 23.216,50.876 25.121,48.971 U4.6
  Top Layer w1: R19.2 R19.2@11.552,49.149
  Bottom Layer w0.6: 11.516,51.333 15.291,51.333 15.9,50.724 C11.1 15.918,49.206 17.221,49.206 17.632,49.616 R18.1 17.907,49.641 17.907,50.876 v1(17.932,50.902)
  Bottom Layer w1: R19.2 11.516,49.113 11.516,51.333 11.516,53.071 TP27.1@11.557,53.111
NetC11_2: C11.2 D4.1 R18.2 R21.1 TP2.1 U4.7 | length 24.5
  Top Layer w0.6: D4.1@19.38,44.221 TP2.1 25.348,46.836 26.213,47.701 U4.7
  Bottom Layer w0.4: R18.2 17.882,46.169 19.931,44.12 25.246,44.12 TP2.1 ; TP2.1@25.375,44.221 R21.1
  Bottom Layer w0.6: C11.2 15.911,47.677 17.357,47.677 17.871,47.677 R18.2
NetC12_1: C12.1 R23.1 R24.2 TP29.1 U4.2 | length 30.3
  Top Layer w0.6: U4.2 35.027,47.701 36.805,45.923 38.723,45.923 40.018,44.628 TP29.1 ; TP29.1@45.212,44.908 47.188,46.883 R24.2
  Bottom Layer w0.6: C12.1 39.486,49.476 39.486,49.927 39.386,50.028 39.386,51.583 40.415,52.612 43.42,52.612 45.228,50.805 R24.2
NetC12_2: C12.2 D5.1 R23.2 R26.1 TP20.1 U4.1 | length 24.2
  Top Layer w0.6: U4.1 34.138,46.431 34.519,46.05 TP20.1 ; TP20.1@34.557,44.234 D5.1@38.354,44.234
  Bottom Layer w0.6: R26.1 32.801,44.247 TP20.1@34.29,44.247 ; TP20.1 41.173,44.272 42.326,45.425 42.326,47.937 41.336,48.926 41.336,49.229 41.244,49.321 41.161,49.676 R23.2@41.161,51.74
NetC13_1: C13.1 R27.2 R33.1 | length 4.4
  Bottom Layer w0.6: C13.1@18.948,35.573 R27.2@18.948,38.227 ; C13.1 19.175,35.699 20.55,35.699 R33.1
NetC13_2: C13.2 C14.1 D5.2 R33.2 R34.1 TP15.1 U1.3 | length 30.6
  Top Layer w0.6: TP15.1 25.146,33.858 25.603,33.401 34.138,33.401 34.823,34.087 34.823,38.735 37.211,41.122 D5.2
  Bottom Layer w0.6: C14.1 14.09,34.36 15.596,34.36 15.803,34.153 18.97,34.153 C13.2 19.15,33.974 20.576,33.974 R33.2 23.175,33.874 TP15.1
NetC14_2: C14.2 R29.2 R34.2 TP7.1 | length 6.4
  Bottom Layer w0.6: C14.2@14.076,35.703 C14.2@14.076,36.332 ; R29.2@14.224,38.116 14.076,37.967 C14.2@14.076,36.332 ; TP7.1 16.205,38.024 16.205,36.484 R34.2 C14.2@14.076,36.332
NetC19_2: C19.2 R17.2 R19.1 TP1.1 | length 19.8
  Top Layer w0.6: R19.1 8.936,47.757 9.779,46.914 17.221,46.914 19.253,48.946 TP1.1
  Bottom Layer w0.6: C19.2 21.86,46.783 21.96,46.883 22.128,46.883 22.479,47.235 TP1.1 ; R17.2 C19.2@21.946,46.126
NetC20_2: C20.2 R22.2 R24.1 TP19.1 | length 8.6
  Top Layer w0.6: TP19.1 42.464,46.66 R24.1
  Bottom Layer w0.6: C20.2 38.372,45.296 38.372,46.627 R22.2 38.376,46.647 40.373,46.647 TP19.1
NetP2_1: P2.1 P2.4 R6.2 R32.2 | length 23.8
  Bottom Layer w1: P2.4 43.688,4.242 47.752,8.306 ; R32.2@47.752,13.64 47.752,8.306 ; R32.2@47.778,13.64 R6.2@47.778,17.12 ; P2.1 51.308,4.75 47.752,8.306
NetP2_2: P2.2 R1.1 | length 37.6
  Top Layer w0.6: v1(42.393,28.219) 45.974,28.219 50.317,23.876 50.317,6.198 48.768,4.648 P2.2
  Bottom Layer w0.6: R1.1 42.297,28.26 42.3,28.258 42.349,28.258 v1@42.352,28.26
NetP2_3: P2.3 R28.1 | length 46.2
  Top Layer w0.6: v1(45.345,27.073) 49.251,23.168 49.251,7.518 46.228,4.496 P2.3
  Bottom Layer w0.6: R28.1 42.494,35.662 45.345,32.81 v1@45.345,27.127
NetP2_5: P2.5 R5.1 | length 70.5
  Top Layer w0.6: v1@12.383,29.604 16.916,25.07 45.872,25.07 48.285,22.657 48.285,9.55 P2.5
  Bottom Layer w0.6: R5.1 7.153,32.598 10.109,29.642 v1(12.344,29.642)
NetP2_6: P2.6 R25.1 TP22.1 U4.3 | length 75.8
  Top Layer w0.6: U4.3 TP22.1@37.262,48.971 ; TP22.1@37.465,49.124 40.183,51.841 v1(49.073,51.841) ; P2.6 41.148,4.953 42.164,4.953 47.055,9.844 v1(47.055,21.692)
  Bottom Layer w0.6: v1(47.055,21.692) 50.914,25.551 50.914,32.309 50.271,32.952 50.271,40.802 50.982,41.513 50.982,49.932 v1(49.073,51.841)
  Bottom Layer w1: R25.1@35.392,48.984 37.249,48.984 TP22.1
NetP2_7: P2.7 R20.1 TP3.1 U4.5 | length 89.6
  Top Layer w0.6: TP3.1 25.489,51.854 25.489,50.593 25.841,50.241 U4.5 ; P2.7 39.878,6.223 41.935,6.223 45.822,10.109 v1(45.822,22.428)
  Bottom Layer w0.6: R20.1 19.888,51.079 20.65,51.841 25.47,51.841 33.452,51.841 35.077,53.466 45.136,53.466 48.474,50.129 48.474,25.081 v1(45.822,22.428)
NetP2_11: P2.11 R8.2 | length 7
  Bottom Layer w1: P2.11 25.828,2.493 25.828,4.035 28.509,6.716 28.509,6.753 28.663,6.906 R8.2@29.947,6.906
NetP2_12: P2.12 R11.2 | length 6
  Bottom Layer w0.5: P2.12@23.368,2.245 P2.12 ; R11.2@24.195,6.618 24.195,6.63 24.548,6.982 R11.2
  Bottom Layer w1: P2.12 23.368,5.791 R11.2@24.195,6.618
NetP2_15: P2.15 R13.2 | length 4.9
  Bottom Layer w1: P2.15 15.872,2.537 15.872,6.804 15.975,6.906 R13.2
NetP2_16: P2.16 R14.2 TP25.1 | length 15.6
  Top Layer w0.5: TP25.1@11.954,13.204 11.954,13.056 TP25.1@12.231,12.778
  Bottom Layer w1: R14.2 12.394,6.958 10.645,6.958 9.652,7.95 9.652,12.09 10.617,13.056 TP25.1 ; P2.16 R14.2@13.208,6.753
NetR3_1: R3.1 R27.1 R30.1 TP5.1 U1.2 | length 23.4
  Top Layer w0.6: TP5.1 24.816,36.043 26.187,34.671 U1.2
  Bottom Layer w0.6: R27.1@18.755,39.964 R27.1 22.647,39.964 TP5.1@24.798,37.812 ; R3.1 24.798,39.733 TP5.1@24.798,37.812 ; TP5.1@24.798,37.795 TP5.1@24.798,37.812 ; R30.1 26.712,34.833 26.537,35.008 26.537,36.074 TP5.1 TP5.1@24.798,37.812
NetR4_1: R4.1 R29.1 R31.1 U1.15 | length 34.6
  Top Layer w0.6: v1(36.068,37.389) 36.068,35.872 37.269,34.671 U1.15
  Bottom Layer w0.6: R31.1@8.189,40.157 R31.1@8.196,40.15 ; R31.1@8.222,40.15 10.584,40.15 R4.1 ; R4.1@10.592,40.32 13.72,40.32 13.974,40.066 R29.1@14.224,40.066 ; R29.1 14.474,40.269 16.952,40.269 17.78,41.097 27.813,41.097 31.521,37.389 v1(36.068,37.389) ; R29.1@14.474,40.066 R29.1@14.649,40.241
NetR7_1: R7.1 R15.1 TP10.1 U2.1 U3.2 | length 50.7
  Top Layer w0.6: v1(14.834,18.974) 14.834,14.376 16.965,12.245 18.282,12.245 U3.2 ; U2.1@35.836,13.513 35.776,13.573 34.636,13.573 33.528,14.681 v1(33.528,18.161) 33.528,18.186 34.874,19.533 39.111,19.533 TP10.1@41.095,21.516
  Bottom Layer w0.6: R15.1 v1(14.834,18.974) 17.907,22.047 29.642,22.047 v1(33.528,18.161) ; R7.1@41.186,25.073 R7.1
  Bottom Layer w1: TP10.1@41.25,21.468 R7.1@41.25,24.968
NetR7_2: R7.2 U1.9 | length 2.6
  Top Layer w0.6: U1.9 39.513,27.051 39.567,26.997 v1(39.621,26.997)
  Bottom Layer w0.6: v1@39.659,27.035 R7.2
NetR8_1: R8.1 TP11.1 U2.7 | length 20.7
  Top Layer w0.6: U2.7 40.602,12.303 41.706,12.303 TP11.1@43.5,14.097
  Bottom Layer w0.8: R8.1@29.947,9.807 32.87,9.807 33.807,10.744 33.807,13.513 34.392,14.097 TP11.1@43.5,14.097
NetR10_1: R10.1 R16.1 TP13.1 U2.2 U3.1 | length 45.2
  Top Layer w0.6: v1(16.535,17.018) 16.51,16.993 16.51,14.758 17.755,13.513 U3.1@18.336,13.513 ; U2.2 33.985,12.243 32.334,13.894 v1(32.334,17.094) 32.334,19.66 34.312,21.637 TP13.1
  Bottom Layer w0.6: R16.1 13.434,16.98 16.497,16.98 v1(16.535,17.018) 16.535,19.152 17.02,19.636 18.232,20.849 28.58,20.849 v1(32.334,17.094) ; TP13.1@36.879,21.649 TP13.1 ; R10.1@36.932,23.434 R10.1@36.943,23.423
  Bottom Layer w1: TP13.1@36.943,21.607 R10.1@36.943,23.423
NetR10_2: R10.2 U1.10 | length 4.2
  Top Layer w0.6: v1(36.906,26.633) 36.906,27.97 37.258,28.321 U1.10
  Bottom Layer w0.6: R10.2 v1(36.906,26.633)
NetR11_1: R11.1 U2.4 | length 11.1
  Top Layer w0.8: v1(31.471,11.405) 33.172,9.703 U2.4
  Bottom Layer w0.8: R11.1@26.114,9.948 27.57,11.405 v1(31.471,11.405)
NetR12_1: R12.1 TP12.1 U1.6 | length 9.1
  Top Layer w0.6: TP12.1@26.945,29.032 30.455,29.032 31.013,29.591 U1.6
  Bottom Layer w0.6: R12.1 24.874,28.999 27.043,28.999 TP12.1 ; TP12.1@27.076,28.847 27.17,28.847 TP12.1@27.457,29.134
NetR13_1: R13.1 TP18.1 U3.7 | length 15.7
  Top Layer w0.6: U3.7@23.016,12.243 25.327,12.243 26.343,13.259 TP18.1@26.594,13.259
  Bottom Layer w0.8: R13.1 19.104,9.807 22.758,13.462 TP18.1
NetR14_1: R14.1 U3.4 | length 5
  Top Layer w0.8: v1(13.894,9.703) U3.4
  Bottom Layer w1: R14.1@13.273,9.782 13.273,9.78 13.35,9.703 v1(13.894,9.703)
VCC: C15.2 C16.1 C17.1 L1.1 R17.1 R22.1 TP23.1 U1.12 U4.8 VD1.1 | length 151.6
  Top Layer w0.6: v1@23.241,42.977 23.228,42.989 17.386,42.989 v1(17.348,43.028) 10.541,43.028 10.47,42.957 VD1.1 2.692,45.415 8.331,51.054 14.503,51.054 17.475,54.026 49.403,54.026 51.816,51.613 51.816,42.323 50.804,41.311 L1.1@46.584,41.311 ; v1@23.321,42.951 23.956,42.316 26.467,42.316 30.099,45.949 v1(30.099,48.108) ; U4.8 28.114,46.431 v1(28.876,47.193) ; TP23.1 34.061,42.418 40.665,42.418 43.008,40.076 43.008,32.06 41.808,30.861 U1.12
  Bottom Layer w0.6: C16.1@16.033,42.869 C16.1 16.154,42.989 17.31,42.989 v1(17.348,43.028) ; R17.1 22.101,42.99 v1@23.228,42.99 ; v1@23.329,42.913 23.926,42.316 29.388,42.316 TP23.1 ; v1(28.876,47.193) 28.915,47.231 C17.1@30.022,47.231 ; C17.1@30.023,47.232 33.769,47.232 34.366,46.634 R22.1 ; C17.1@30.086,47.245 30.086,48.095 v1(30.099,48.108)
  other v1: 23.266,42.951

## Polygon pours and split planes (outlines as drawn)
GND on Top Layer "GND_L01_P002" (solid, pour order 2): 0,54.991 0,0 59.995,0 59.995,54.991
GND on Bottom Layer "GND_L02_P000" (solid, pour order 0): 0,54.991 0,0 59.995,0 59.995,54.991

## Keep-outs
Keep-Out Layer:
  circle w0.254: c57,3 r1.5
  circle w0.254: c3,52 r1.5
  circle w0.254: c57,52 r1.5
  circle w0.254: c3,3 r1.5
  lines w0.254: 0,2.972 0,52.019 ; 0,3 ccw(c3,3) 3,0 ; 0,52 cw(c3,52) 3,55 ; 2.997,55 57,55 cw(c57,52) 60,52 ; 3.023,0 56.972,0 ; 57,0 ccw(c57,3) 60,3 ; 60,3.073 60,52.019

## Silkscreen, mask and mechanical layers (free items; w line width, h text height)
Top Overlay:
  circle w0.013: c13.214,2.384 r0.55
  circle w0.013: c41.154,2.384 r0.55
  circle w0.013: c38.614,2.384 r0.55
  circle w0.013: c46.234,2.384 r0.55
  circle w0.013: c8.134,2.384 r0.55
  circle w0.013: c10.674,2.384 r0.55
  circle w0.013: c51.314,2.384 r0.55
  circle w0.013: c48.774,2.384 r0.55
  circle w0.013: c43.694,2.384 r0.55
  circle w0.013: c25.914,2.384 r0.55
  circle w0.013: c23.374,2.384 r0.55
  circle w0.013: c30.994,2.384 r0.55
  circle w0.013: c20.834,2.384 r0.55
  circle w0.013: c33.534,2.384 r0.55
  circle w0.013: c15.754,2.384 r0.55
  circle w0.013: c18.294,2.384 r0.55
  circle w0.013: c28.454,2.384 r0.55
  circle w0.013: c36.074,2.384 r0.55
  text "GND" at 8.436,4.7 h0.8 r90
  text "LO_2" at 13.408,4.7 h0.8 r90
  text "HO_2" at 15.974,4.7 h0.8 r90
  text "GND" at 18.545,4.7 h0.8 r90
  text "VS_1" at 21.13,4.7 h0.8 r90
  text "LO_1" at 23.619,4.7 h0.8 r90
  text "HO_1" at 26.159,4.7 h0.8 r90
  text "AND" at 28.654,4.7 h0.8 r90
  text "KAT" at 31.144,4.7 h0.8 r90
  text "GND" at 33.76,4.7 h0.8 r90
  text "FDB_2" at 36.294,4.7 h0.8 r90
  text "FDB_1" at 38.834,4.7 h0.8 r90
  text "DT" at 41.354,4.7 h0.8 r90
  text "VCC" at 43.996,4.7 h0.8 r90
  text "IO" at 46.485,4.7 h0.8 r90
  text "IS" at 48.974,4.7 h0.8 r90
  text "VCC" at 51.616,4.7 h0.8 r90
  text "VS_2" at 10.995,4.67 h0.8 r90
Top 3D Body:
  region: 51.887,3.185 52.024,3.094 52.115,2.958 52.147,2.797 52.139,1.972 52.147,1.972 52.115,1.811 52.024,1.674 51.887,1.583 51.726,1.551 50.901,1.559 50.901,1.551 50.74,1.583 50.604,1.674 50.513,1.811 50.481,1.972 50.489,2.797 50.481,2.797 50.513,2.958 50.604,3.094 50.74,3.185 50.901,3.217 50.901,3.209 51.726,3.209 51.726,3.217
Bottom 3D Body:
  circle w0.013: c41.154,2.384 r0.825
  circle w0.013: c38.614,2.384 r0.825
  circle w0.013: c43.694,2.384 r0.825
  circle w0.013: c36.074,2.384 r0.825
  circle w0.013: c46.234,2.384 r0.825
  circle w0.013: c13.214,2.384 r0.825
  circle w0.013: c10.674,2.384 r0.825
  circle w0.013: c8.134,2.384 r0.825
  circle w0.013: c48.774,2.384 r0.825
  circle w0.013: c20.834,2.384 r0.825
  circle w0.013: c23.374,2.384 r0.825
  circle w0.013: c30.994,2.384 r0.825
  circle w0.013: c15.754,2.384 r0.825
  circle w0.013: c28.454,2.384 r0.825
  circle w0.013: c25.914,2.384 r0.825
  circle w0.013: c33.534,2.384 r0.825
  circle w0.013: c18.294,2.384 r0.825
  circle w0.013: c15.754,2.384 r0.825
  circle w0.013: c18.294,2.384 r0.825
  circle w0.013: c20.834,2.384 r0.825
  circle w0.013: c23.374,2.384 r0.825
  circle w0.013: c25.914,2.384 r0.825
  circle w0.013: c28.454,2.384 r0.825
  circle w0.013: c30.994,2.384 r0.825
  circle w0.013: c33.534,2.384 r0.825
  circle w0.013: c36.074,2.384 r0.825
  circle w0.013: c46.234,2.384 r0.825
  circle w0.013: c48.774,2.384 r0.825
  circle w0.013: c43.694,2.384 r0.825
  circle w0.013: c41.154,2.384 r0.825
  circle w0.013: c38.614,2.384 r0.825
  circle w0.013: c13.214,2.384 r0.825
  circle w0.013: c10.674,2.384 r0.825
  circle w0.013: c8.134,2.384 r0.825
  region: 51.887,3.185 52.024,3.094 52.115,2.958 52.147,2.797 52.139,1.972 52.147,1.972 52.115,1.811 52.024,1.674 51.887,1.583 51.726,1.551 50.901,1.559 50.901,1.551 50.74,1.583 50.604,1.674 50.513,1.811 50.481,1.972 50.489,2.797 50.481,2.797 50.513,2.958 50.604,3.094 50.74,3.185 50.901,3.217 50.901,3.209 51.726,3.209 51.726,3.217
Top Assembly:
  lines w0.013: 0,-0.009 0,54.991 60,54.991 60,-0.009 0,-0.009
Bottom Assembly:
  circle w0.013: c15.754,2.384 r0.825
  circle w0.013: c18.294,2.384 r0.825
  circle w0.013: c20.834,2.384 r0.825
  circle w0.013: c23.374,2.384 r0.825
  circle w0.013: c25.914,2.384 r0.825
  circle w0.013: c28.454,2.384 r0.825
  circle w0.013: c30.994,2.384 r0.825
  circle w0.013: c33.534,2.384 r0.825
  circle w0.013: c36.074,2.384 r0.825
  circle w0.013: c46.234,2.384 r0.825
  circle w0.013: c48.774,2.384 r0.825
  circle w0.013: c43.694,2.384 r0.825
  circle w0.013: c41.154,2.384 r0.825
  circle w0.013: c38.614,2.384 r0.825
  circle w0.013: c13.214,2.384 r0.825
  circle w0.013: c10.674,2.384 r0.825
  circle w0.013: c8.134,2.384 r0.825
  region: 51.887,3.185 52.024,3.094 52.115,2.958 52.147,2.797 52.139,1.972 52.147,1.972 52.115,1.811 52.024,1.674 51.887,1.583 51.726,1.551 50.901,1.559 50.901,1.551 50.74,1.583 50.604,1.674 50.513,1.811 50.481,1.972 50.489,2.797 50.481,2.797 50.513,2.958 50.604,3.094 50.74,3.185 50.901,3.217 50.901,3.209 51.726,3.209 51.726,3.217